# Altium PCB PCB.PcbDoc (part 6 of 8)
Units mm, origin at the board's own origin, x right, y up, seen from the top; angles counter-clockwise.
Board outline 78.8 x 69 mm, 12 copper layers (Top Layer, GND_12, uStrip1, GND_35, Clocks, GND_57, POWER, Slow_Ctrl, GND_810, uStrip2, GND_1012, Bottom Layer), stack 2.926 mm thick; 460 components, 314 nets, 1929 pads, 3409 vias.
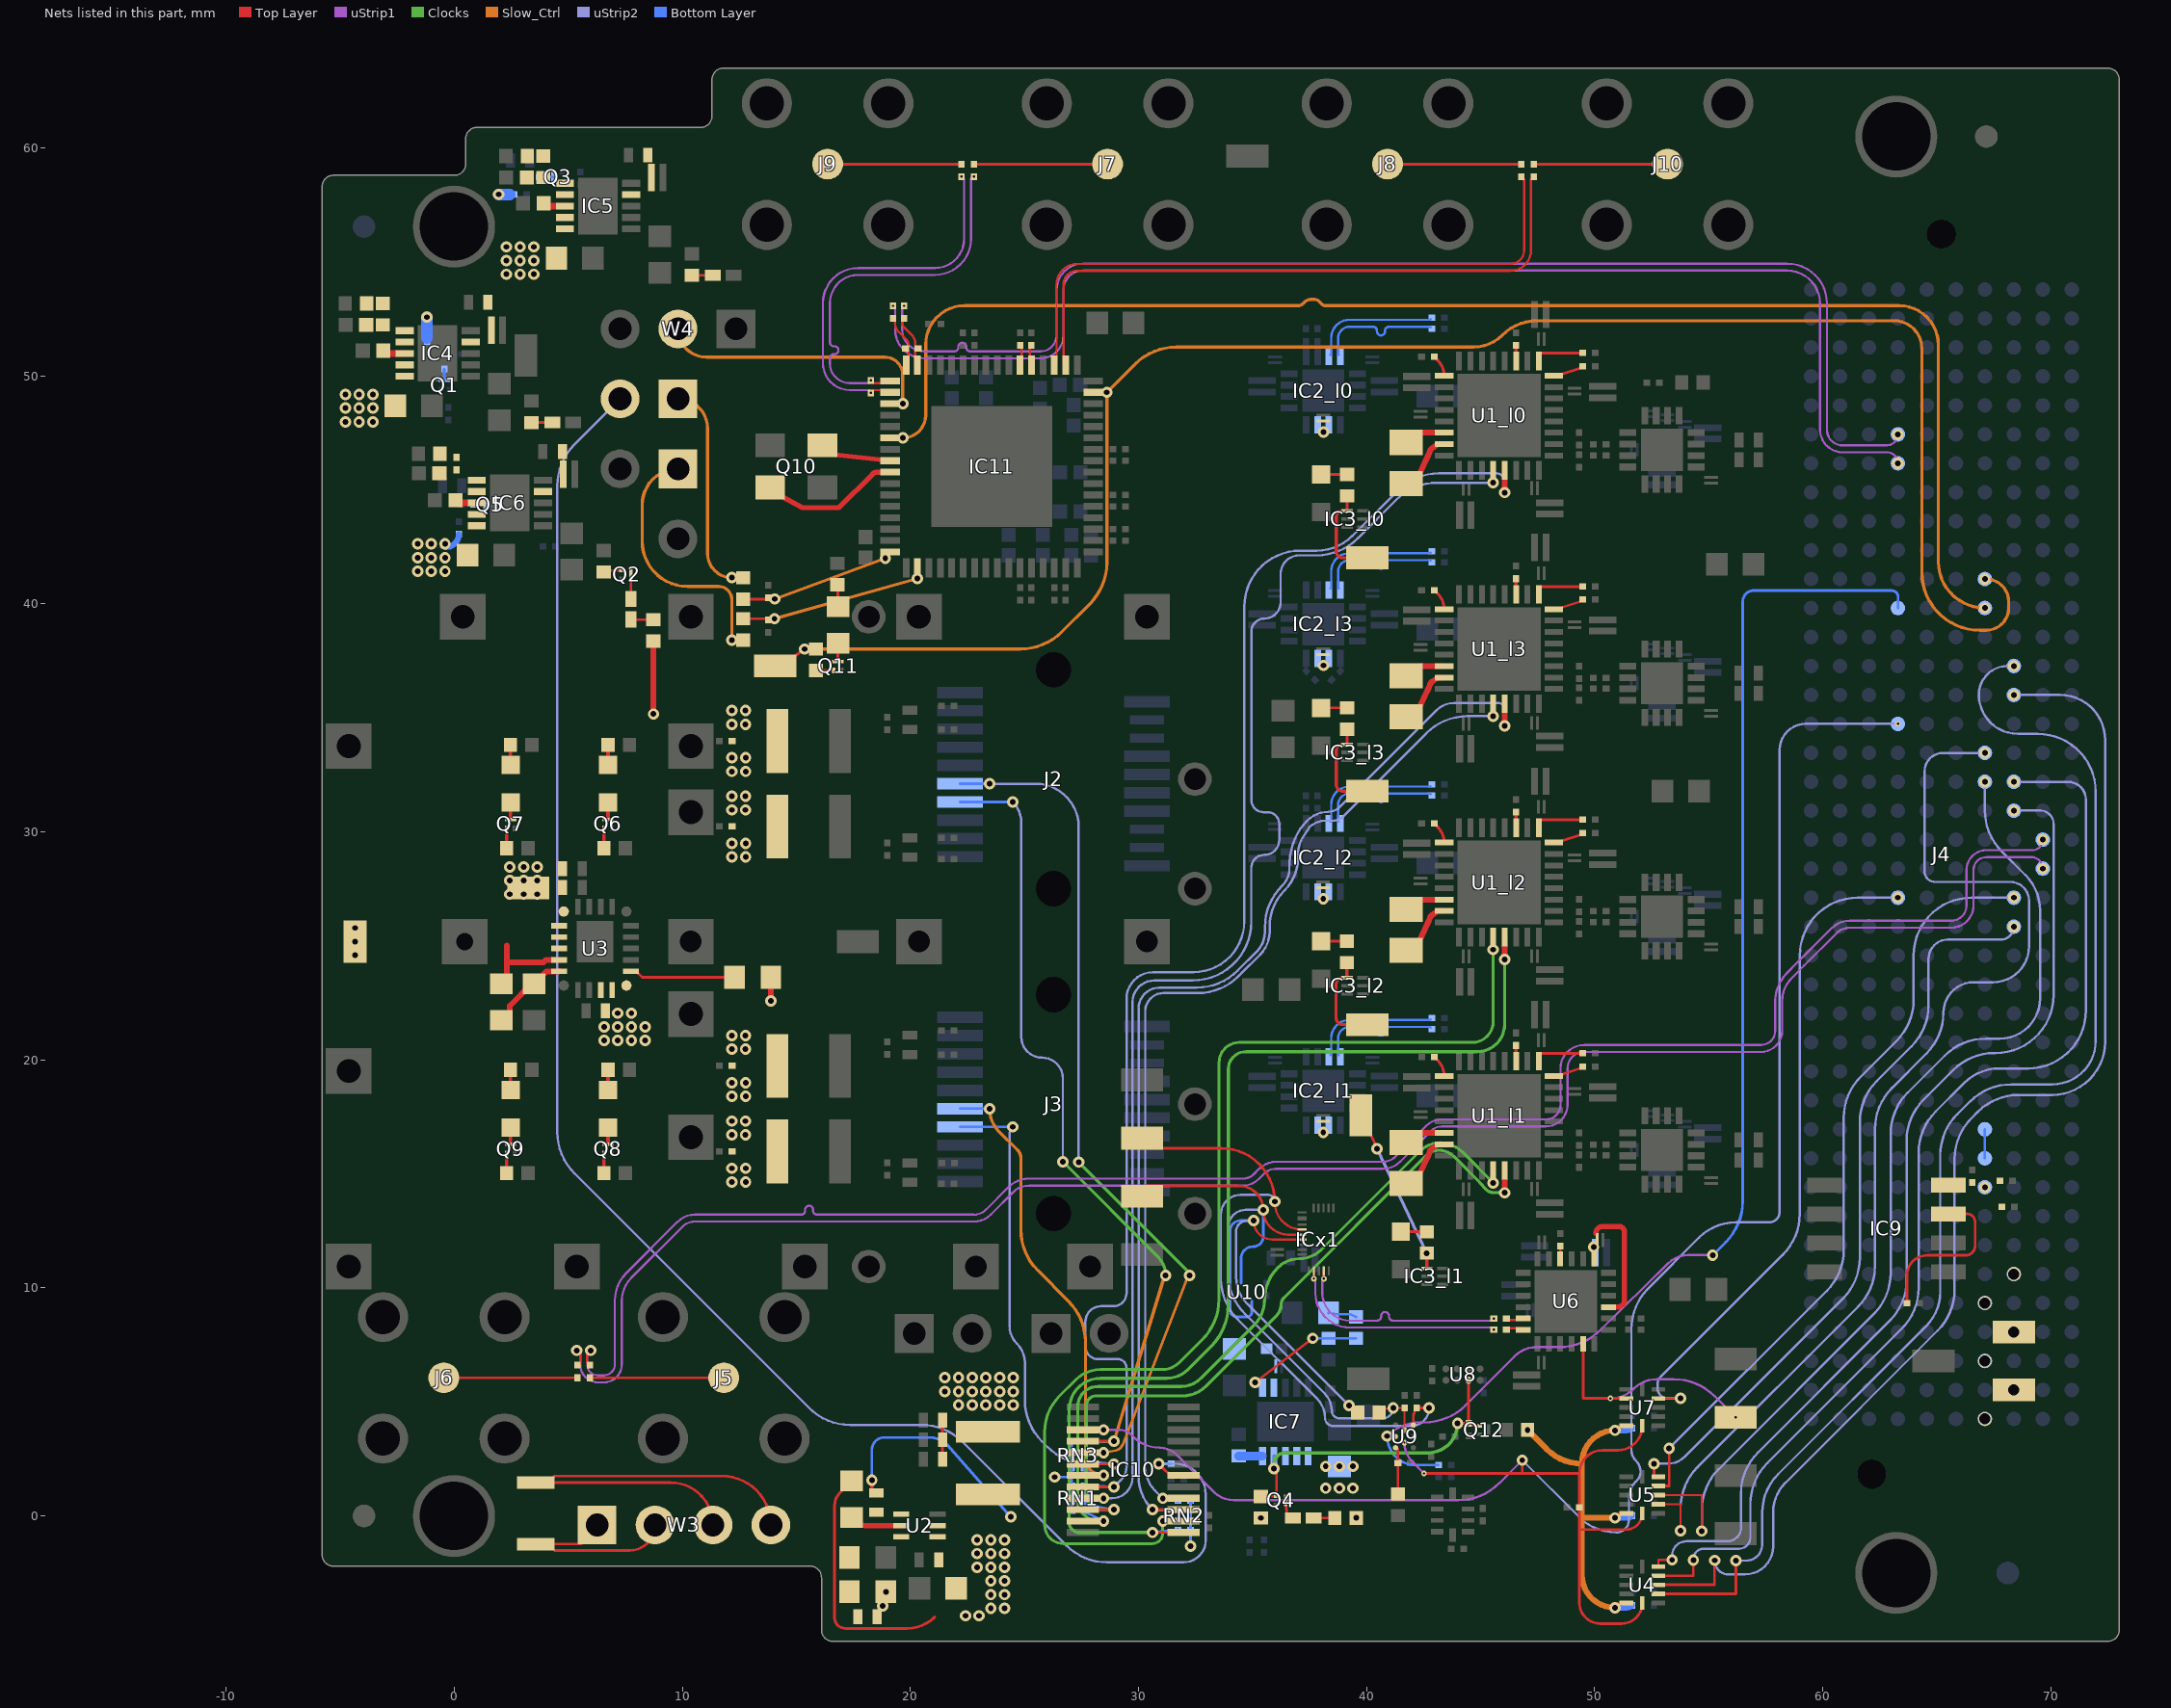
[diagram p15: the nets of this part, all layers, seen from the top]

## Via types
v1: diameter 0.25, hole 0.1, Top Layer to uStrip1, tented both sides, 1130 vias
v2: diameter 0.25, hole 0.1, uStrip2 to Bottom Layer, tented both sides, 686 vias
v3: diameter 0.5, hole 0.25, Top Layer to Bottom Layer, tented both sides, 674 vias
v4: diameter 0.5, hole 0.25, Top Layer to Bottom Layer, 632 vias
v5: diameter 0.5, hole 0.25, uStrip1 to uStrip2, tented both sides, 281 vias
v6: diameter 0.584, hole 0.483, Top Layer to Bottom Layer, tented both sides, 6 vias

## Nets (pads, with @x,y where several pads share a name; then routed paths per layer and width w, separated by ;. In a path a pad name is that pad's centre, name@x,y a point inside that pad or via, vN(x,y) a via of type N, cw(c..) or ccw(c..) an arc to the next point about the centre after c; other vN are vias at no path point) (continued)
GT_REFCLK_AUX_N: C96.1 J4.B21 | length 81.2
  Top Layer w0.099: v3(5.374,7.262) cw(c5.374,7.113) 5.524,7.113 5.524,6.735 cw(c5.401,6.735) C96.1@5.401,6.612
  uStrip1 w0.094: v3(5.374,7.262) cw(c5.374,7.113) 5.524,7.113 5.524,6.8 5.524,6.64 ccw(c6.298,6.64) 6.298,5.865 6.562,5.865 ccw(c6.562,6.646) 7.344,6.646 7.344,9.439 cw(c8.759,9.439) 7.758,10.44 10.002,12.684 cw(c10.555,12.132) 10.555,12.913 10.882,12.913 22.778,12.912 22.78,12.912 ccw(c22.78,13.966) 23.525,13.221 24.51,14.206 cw(c25.198,13.518) 25.198,14.49 34.583,14.49 ccw(c34.581,15.457) 35.265,14.774 35.499,15.008 cw(c36.031,14.476) 36.031,15.228 40.71,15.228 ccw(c40.71,16.324) 41.485,15.549 42.826,16.89 cw(c43.303,16.412) 43.303,17.088 47.864,17.088 ccw(c47.864,18.03) 48.807,18.03 48.807,19.624 cw(c49.537,19.624) 49.537,20.354 57.296,20.354 ccw(c57.296,21.279) 58.222,21.279 58.222,22.579 cw(c59.665,22.579) 58.641,23.596 59.183,24.138 60.608,25.564 cw(c61.19,24.982) 61.19,25.805 65.641,25.805 ccw(c65.641,26.774) 66.61,26.774 66.61,28.333 cw(c67.174,28.333) 67.174,28.898 69.14,28.898 cw(c69.14,28.39) v3(69.648,28.39)
GT_REFCLK_AUX_P: C91.1 J4.B20 | length 81.2
  Top Layer w0.099: C91.1@5.951,6.612 cw(c5.951,6.735) 5.828,6.735 5.828,7.113 cw(c5.978,7.113) v3(5.978,7.262)
  uStrip1 w0.094: v3(5.978,7.262) ccw(c5.978,7.113) 5.828,7.113 5.828,6.926 5.828,6.64 ccw(c6.298,6.64) 6.298,6.17 6.562,6.17 ccw(c6.562,6.646) 7.039,6.646 7.039,9.44 cw(c8.759,9.439) 7.542,10.654 9.787,12.9 cw(c10.555,12.132) 10.555,13.218 10.879,13.218 14.465,13.217 14.512,13.217 15.208,13.217 ccw(c15.208,13.391) 15.382,13.391 15.382,13.434 cw(c15.556,13.434) 15.73,13.434 15.73,13.391 ccw(c15.904,13.391) 15.904,13.217 16.228,13.217 16.275,13.217 22.778,13.217 ccw(c22.778,13.971) 23.311,13.438 24.296,14.422 cw(c25.196,13.522) 25.196,14.795 25.198,14.795 34.581,14.795 ccw(c34.581,15.457) 35.049,14.989 ; 35.049,14.989 35.283,15.223 cw(c36.031,14.476) 36.031,15.533 40.709,15.533 ccw(c40.709,16.328) 41.271,15.766 42.61,17.105 cw(c43.303,16.412) 43.303,17.392 47.864,17.392 ccw(c47.864,18.03) 48.502,18.03 48.502,19.624 cw(c49.537,19.624) 49.537,20.659 57.296,20.659 ccw(c57.296,21.279) 57.917,21.279 57.917,22.579 cw(c59.665,22.579) 58.429,23.815 58.879,24.264 60.393,25.779 cw(c61.19,24.982) 61.19,26.109 65.641,26.109 ccw(c65.641,26.774) 66.305,26.774 66.305,28.333 cw(c67.174,28.333) 67.174,29.202 69.19,29.202 ccw(c69.19,29.66) v3(69.648,29.66)
IN0_N: C107.1 IC11.64 R67.1 | length 2.2
  Top Layer w0.099: C107.1@19.228,52.525 19.228,52.484 19.325,52.386 19.325,52.309 19.325,52.307 ccw(c19.825,52.309) 19.412,52.027 19.439,51.988 19.829,51.598 cw(c19.644,51.412) 19.906,51.412 19.906,51.335 R67.1@19.783,51.212 19.906,51.09 19.906,50.681 IC11.64@19.881,50.656
IN0_P: C105.1 IC11.63 R67.2 | length 2.2
  Top Layer w0.099: C105.1@19.727,52.525 19.727,52.484 19.63,52.386 19.63,52.309 ccw(c19.825,52.309) 19.687,52.171 20.074,51.784 20.099,51.75 cw(c19.644,51.412) 20.211,51.412 20.211,51.335 R67.2@20.333,51.212 20.211,51.09 20.211,50.681 IC11.63@20.236,50.656
IN1_N: C102.1 IC11.2 R65.1 | length 17
  Top Layer w0.099: v1(18.269,49.255) cw(c18.392,49.255) 18.392,49.378 19.011,49.378 cw(c19.011,49.28) IC11.2@19.108,49.28
  uStrip1 w0.094: v1(18.269,49.255) ccw(c18.146,49.255) 18.146,49.378 17.338,49.378 cw(c17.338,50.554) 16.162,50.554 16.162,53.193 cw(c17.705,53.193) 17.705,54.735 21.07,54.735 ccw(c21.07,56.02) 22.355,56.02 22.355,58.617 ccw(c22.232,58.617) v1(22.232,58.739)
IN1_P: C99.1 IC11.1 R65.2 | length 17
  Top Layer w0.099: v1(18.269,49.805) ccw(c18.392,49.805) 18.392,49.683 19.011,49.683 ccw(c19.011,49.78) IC11.1@19.108,49.78
  uStrip1 w0.094: v1(18.269,49.805) cw(c18.146,49.805) 18.146,49.683 17.338,49.683 cw(c17.338,50.554) 16.483,50.386 cw(c17.338,50.554) 16.475,50.433 16.467,50.554 16.467,50.781 cw(c16.641,50.781) 16.641,50.955 16.669,50.955 ccw(c16.669,51.129) 16.669,51.303 16.641,51.303 cw(c16.641,51.477) 16.467,51.477 16.467,52.104 16.467,53.193 cw(c17.705,53.193) 17.705,54.431 21.07,54.431 ccw(c21.07,56.02) 22.66,56.02 22.66,58.617 cw(c22.782,58.617) v1(22.782,58.739)
IN_l0_N: C29_l0.1 IC2_l0.11 | length 5.6
  Bottom Layer w0.099: IC2_l0.11@38.423,50.923 38.447,50.948 38.447,51.5 38.447,51.661 cw(c39.249,51.661) 39.249,52.462 42.71,52.462 42.712,52.464 42.781,52.464 C29_l0.1@42.805,52.487
IN_l0_P: C30_l0.1 IC2_l0.12 | length 5.5
  Bottom Layer w0.099: IC2_l0.12@38.777,50.923 38.752,50.948 38.752,51.374 38.752,51.661 cw(c39.249,51.661) 39.249,52.158 39.875,52.158 40.278,52.158 cw(c40.278,51.981) 40.454,51.981 40.454,51.956 ccw(c40.631,51.956) 40.807,51.956 40.807,51.981 cw(c40.984,51.981) 40.984,52.158 41.44,52.158 42.71,52.158 42.712,52.156 42.781,52.156 C30_l0.1@42.805,52.133
IN_l1_N: C29_l1.1 IC2_l1.11 | length 5.6
  Bottom Layer w0.099: IC2_l1.11@38.423,20.214 38.447,20.239 38.447,20.791 38.447,20.952 cw(c39.249,20.952) 39.249,21.753 42.71,21.753 42.712,21.754 42.781,21.754 C29_l1.1@42.805,21.778
IN_l1_P: C30_l1.1 IC2_l1.12 | length 5.5
  Bottom Layer w0.099: IC2_l1.12@38.777,20.214 38.752,20.239 38.752,20.665 38.752,20.952 cw(c39.249,20.952) 39.249,21.448 39.875,21.448 40.278,21.448 cw(c40.278,21.272) 40.454,21.272 40.454,21.247 ccw(c40.631,21.247) 40.807,21.247 40.807,21.272 cw(c40.984,21.272) 40.984,21.448 41.44,21.448 42.71,21.448 42.712,21.447 42.781,21.447 C30_l1.1@42.805,21.424
IN_l2_N: C29_l2.1 IC2_l2.11 | length 5.6
  Bottom Layer w0.099: IC2_l2.11@38.423,30.451 38.447,30.475 38.447,31.028 38.447,31.188 cw(c39.249,31.188) 39.249,31.99 42.71,31.99 42.712,31.991 42.781,31.991 C29_l2.1@42.805,32.014
IN_l2_P: C30_l2.1 IC2_l2.12 | length 5.5
  Bottom Layer w0.099: IC2_l2.12@38.777,30.451 38.752,30.475 38.752,30.901 38.752,31.188 cw(c39.249,31.188) 39.249,31.685 39.875,31.685 40.278,31.685 cw(c40.278,31.508) 40.454,31.508 40.454,31.483 ccw(c40.631,31.483) 40.807,31.483 40.807,31.508 cw(c40.984,31.508) 40.984,31.685 41.44,31.685 42.71,31.685 42.712,31.684 42.781,31.684 C30_l2.1@42.805,31.66
IN_l3_N: C29_l3.1 IC2_l3.11 | length 5.6
  Bottom Layer w0.099: IC2_l3.11@38.423,40.687 38.447,40.712 38.447,41.264 38.447,41.425 cw(c39.249,41.425) 39.249,42.226 42.71,42.226 42.712,42.227 42.781,42.227 C29_l3.1@42.805,42.251
IN_l3_P: C30_l3.1 IC2_l3.12 | length 5.5
  Bottom Layer w0.099: IC2_l3.12@38.777,40.687 38.752,40.712 38.752,41.138 38.752,41.425 cw(c39.249,41.425) 39.249,41.921 39.875,41.921 40.278,41.921 cw(c40.278,41.745) 40.454,41.745 40.454,41.719 ccw(c40.631,41.719) 40.807,41.719 40.807,41.745 cw(c40.984,41.745) 40.984,41.921 41.44,41.921 42.71,41.921 42.712,41.92 42.781,41.92 C30_l3.1@42.805,41.896
LOL_0_ADJ: J4.C15 U4.3 | length 55.1
  Top Layer w0.117: U4.3@52.789,-3.019 55.258,-3.019 v3(55.258,-1.945)
  uStrip2 w0.102: v3(55.258,-1.945) ccw(c55.876,-1.945) 55.876,-2.563 56.594,-2.563 ccw(c56.594,-1.33) 57.827,-1.33 57.827,0.169 cw(c59.636,0.169) 58.357,1.448 65.036,8.127 ccw(c63.24,9.923) 65.78,9.923 65.78,15.652 cw(c68.32,15.652) 66.524,17.448 66.801,17.724 cw(c68.597,15.928) 68.597,18.468 70.059,18.468 ccw(c70.059,20.789) 72.38,20.789 72.38,34.036 ccw(c70.406,34.036) 70.406,36.01 v3(68.378,36.01)
LOL_1_ADJ: J4.C19 U4.5 | length 44.1
  Top Layer w0.094: U4.5@52.789,-2.219 52.789,-1.924 v3(53.396,-1.924)
  uStrip2 w0.102: v3(53.396,-1.924) 53.396,-1.739 cw(c54.029,-1.739) 54.029,-1.106 55.823,-1.106 ccw(c55.823,-0.515) 56.415,-0.515 56.415,0.988 cw(c58.955,0.988) 57.158,2.784 62.934,8.559 ccw(c61.138,10.355) 63.678,10.355 63.678,16.465 cw(c66.218,16.465) 64.422,18.261 65.721,19.56 cw(c67.517,17.764) 67.517,20.304 67.582,20.304 ccw(c67.582,22.844) 70.122,22.844 70.122,30.349 ccw(c69.529,30.349) 69.529,30.942 68.378,30.942 v3(68.378,30.93)
LOL_2_ADJ: J4.D18 U5.3 | length 44.1
  Top Layer w0.094: U5.3@52.789,0.918 54.697,0.918 v3(54.697,-0.66)
  uStrip2 w0.102: v3(54.697,-0.66) 54.697,0.265 cw(c57.237,0.265) 55.441,2.061 62.234,8.854 ccw(c60.438,10.65) 62.978,10.65 62.978,16.768 cw(c65.518,16.768) 63.722,18.564 65.349,20.192 cw(c67.145,18.395) 67.145,20.935 67.765,20.935 ccw(c67.765,22.699) 69.529,22.699 69.529,26.555 ccw(c67.323,26.555) 68.882,28.115 67.851,29.146 cw(c69.648,30.942) 67.108,30.942 v3(67.108,32.2)
LOL_3_ADJ: J4.C23 U5.5 | length 32.7
  Top Layer w0.117: v3(52.602,2.296) 52.602,1.718 U5.5@52.789,1.718
  uStrip2 w0.102: v3(52.602,2.296) 53.211,2.296 ccw(c53.211,3.342) 53.951,2.602 60.882,9.533 ccw(c59.086,11.329) 61.626,11.329 61.626,17.278 cw(c64.166,17.278) 62.369,19.074 63.893,20.598 ccw(c62.097,22.394) 64.637,22.394 64.637,24.422 cw(c65.497,24.422) 65.497,25.283 67.81,25.283 ccw(c67.81,25.85) v3(68.378,25.85)
LOS_0_ADJ: J4.C14 U4.2 | length 56.9
  Top Layer w0.117: U4.2@52.789,-3.419 56.189,-3.419 v3(56.189,-1.956)
  uStrip2 w0.102: v3(56.189,-1.956) 56.645,-1.956 ccw(c56.645,-1.258) 57.343,-1.258 57.343,0.144 cw(c59.737,0.144) 58.044,1.837 64.536,8.328 ccw(c63.05,9.814) 65.151,9.814 65.151,15.821 cw(c67.691,15.821) 65.895,17.617 66.462,18.184 cw(c68.258,16.388) 68.258,18.928 70.059,18.928 ccw(c70.059,20.837) 71.969,20.837 71.969,31.762 ccw(c69.429,31.762) 69.429,34.302 68.56,34.302 cw(c68.56,36.019) 66.844,36.019 cw(c68.105,36.019) 68.105,37.28 v3(68.378,37.28)
LOS_1_ADJ: J4.C18 U4.4 | length 48.6
  Top Layer w0.117: U4.4@52.789,-2.619 54.327,-2.619 v3(54.327,-1.935)
  uStrip2 w0.102: v3(54.327,-1.935) 54.327,-1.887 cw(c54.78,-1.887) 54.78,-1.433 56.332,-1.433 ccw(c56.332,-0.94) 56.826,-0.94 56.826,0.523 cw(c59.366,0.523) 57.57,2.32 63.463,8.213 ccw(c61.667,10.009) 64.207,10.009 64.207,15.944 cw(c66.747,15.944) 64.951,17.74 66.191,18.981 cw(c67.756,17.416) 67.756,19.629 69.002,19.629 ccw(c69.002,22.168) 71.541,22.168 71.541,31.415 ccw(c70.762,31.415) 70.762,32.195 68.378,32.195 v3(68.378,32.2)
LOS_2_ADJ: J4.D17 U5.2 | length 49.4
  Top Layer w0.094: U5.2@52.789,0.518 53.766,0.518 v3(53.766,-0.65)
  uStrip2 w0.102: v3(53.766,-0.65) 53.766,0.342 cw(c56.306,0.342) 54.51,2.138 ; 54.51,2.138 61.547,9.175 ccw(c59.751,10.971) 62.291,10.971 62.291,16.975 cw(c64.831,16.975) 63.035,18.771 64.547,20.283 ccw(c62.751,22.079) 65.291,22.079 cw(c66.621,22.079) 66.621,23.409 67.467,23.409 ccw(c67.467,24.989) 69.048,24.989 69.048,26.982 ccw(c68.223,26.982) 68.223,27.807 64.925,27.807 cw(c64.925,28.265) 64.467,28.265 64.467,32.662 cw(c65.268,32.662) 65.268,33.464 67.108,33.464 v3(67.108,33.47)
LOS_3_ADJ: J4.C22 U5.4 | length 33.7
  Top Layer w0.117: U5.4@52.789,1.318 53.265,1.318 v3(53.265,2.959)
  uStrip2 w0.102: v3(53.265,2.959) 60.176,9.87 ccw(c58.38,11.666) 60.92,11.666 60.92,17.468 cw(c63.46,17.468) 61.664,19.264 63.239,20.839 ccw(c61.443,22.635) 63.983,22.635 63.983,24.58 cw(c66.523,24.58) 66.523,27.12 v3(68.378,27.12)
NetC28_l0_2: C28_l0.2 U1_l0.3 | length 0.7
  Top Layer w0.137: C28_l0.2@46.549,51.346 46.551,51.344 46.551,50.662 U1_l0.3@46.553,50.66
NetC28_l1_2: C28_l1.2 U1_l1.3 | length 0.7
  Top Layer w0.137: C28_l1.2@46.549,20.637 C28_l1.2@46.551,20.635 46.551,19.953 U1_l1.3@46.553,19.95
NetC28_l2_2: C28_l2.2 U1_l2.3 | length 0.7
  Top Layer w0.137: C28_l2.2@46.549,30.874 46.551,30.871 46.551,30.189 U1_l2.3@46.553,30.187
NetC28_l3_2: C28_l3.2 U1_l3.3 | length 0.7
  Top Layer w0.137: C28_l3.2@46.549,41.11 C28_l3.2@46.551,41.108 46.551,40.425 U1_l3.3@46.553,40.423
NetC31_l0_2: C31_l0.2 IC2_l0.2 IC2_l0.3
  other v3: 38.109,47.538
NetC31_l1_2: C31_l1.2 IC2_l1.2 IC2_l1.3
  other v3: 38.1,16.83
NetC31_l2_2: C31_l2.2 IC2_l2.2 IC2_l2.3
  other v3: 38.1,27.066
NetC31_l3_2: C31_l3.2 IC2_l3.2 IC2_l3.3
  other v3: 38.109,37.302
NetC32_l0_1: C32_l0.1 U1_l0.14 | length 1.8
  Top Layer w0.254: C32_l0.1@41.736,47.085 42.334,47.508 43.124,47.509 U1_l0.14@43.403,47.509
NetC32_l0_2: C32_l0.2 U1_l0.15 | length 2.6
  Top Layer w0.254: C32_l0.2@41.736,45.285 42.334,45.708 42.669,46.44 ccw(c42.461,46.535) 42.672,46.448 42.785,46.723 cw(c42.997,46.636) 42.863,46.822 43.124,47.009 U1_l0.15@43.403,47.009
NetC32_l1_1: C32_l1.1 U1_l1.14 | length 1.8
  Top Layer w0.254: C32_l1.1@41.736,16.376 42.334,16.799 43.124,16.8 U1_l1.14@43.403,16.8
NetC32_l1_2: C32_l1.2 U1_l1.15 | length 2.6
  Top Layer w0.254: C32_l1.2@41.736,14.576 42.334,14.999 42.669,15.731 ccw(c42.461,15.826) 42.672,15.739 42.785,16.014 cw(c42.997,15.927) 42.863,16.113 43.124,16.3 U1_l1.15@43.403,16.3
NetC32_l2_1: C32_l2.1 U1_l2.14 | length 1.8
  Top Layer w0.254: C32_l2.1@41.736,26.612 42.334,27.035 43.124,27.036 U1_l2.14@43.403,27.036
NetC32_l2_2: C32_l2.2 U1_l2.15 | length 2.6
  Top Layer w0.254: C32_l2.2@41.736,24.812 42.334,25.235 42.669,25.967 ccw(c42.461,26.062) 42.672,25.975 42.785,26.25 cw(c42.997,26.163) 42.863,26.349 43.124,26.536 U1_l2.15@43.403,26.536
NetC32_l3_1: C32_l3.1 U1_l3.14 | length 1.8
  Top Layer w0.254: C32_l3.1@41.736,36.848 42.334,37.271 43.124,37.273 U1_l3.14@43.403,37.273
NetC32_l3_2: C32_l3.2 U1_l3.15 | length 2.6
  Top Layer w0.254: C32_l3.2@41.736,35.048 42.334,35.471 42.669,36.203 ccw(c42.461,36.298) 42.672,36.212 42.785,36.487 cw(c42.997,36.4) 42.863,36.585 43.124,36.773 U1_l3.15@43.403,36.773
NetC36_2: C36.2 IC4.7 R11.2
NetC37_2: C37.2 C38.2 IC4.4
NetC39_2: C39.2 IC4.8 | length 1
  Top Layer w0.305: C39.2@-3.116,51.111 -2.958,50.987 IC4.8@-2.182,50.987
NetC41_1: C41.1 L1.1 U2.2 | length 9.9
  Top Layer w0.152: v3(18.309,1.576) 18.309,1.139 C41.1@18.507,1.015
  Bottom Layer w0.117: v3(18.309,1.576) 18.309,2.898 cw(c18.853,2.898) 18.853,3.442 20.846,3.442 cw(c20.846,2.379) 21.595,3.134 21.598,3.131 v3(24.394,-0.034)
NetC41_2: C41.2 U2.4
NetC48_1: C48.1 R15.2 R16.2 U2.6
NetC49_2: C49.2 IC5.7 R17.2
NetC50_2: C50.2 C51.2 IC5.4
NetC52_2: C52.2 IC5.8 | length 1
  Top Layer w0.305: C52.2@3.917,57.573 4.074,57.449 IC5.8@4.851,57.449
NetC58_2: C58.2 IC6.7 R23.2
NetC59_2: C59.2 C60.2 IC6.4
NetC61_2: C61.2 IC6.8 | length 1
  Top Layer w0.305: C61.2@0.05,44.555 ccw(c0.35,44.855) 0.35,44.43 IC6.8@0.984,44.43
NetC66_2: C66.2 C67.2 IC7.7 R35.2
NetC91_2: C91.2 J5.1 | length 5.9
  Top Layer w0.117: C91.2@5.951,6.062 J5.1@11.814,6.062
NetC96_2: C96.2 J6.1 | length 5.9
  Top Layer w0.117: J6.1@-0.461,6.062 C96.2@5.401,6.062
NetC143_2: C143.2 C144.2 U6.3 U6.7 | length 5.4
  Top Layer w0.229: 50.054,12.399 cw(c50.352,12.399) 50.352,12.697 51.055,12.697 cw(c51.055,12.441) 51.311,12.441 51.311,9.468 cw(c51.009,9.468) 51.009,9.165 U6.3@50.609,9.165
  other v3: 49.954,11.799
NetC150_2: C150.2 R80.1 U9.7 | length 2.1
  Top Layer w0.117: U9.7@41.271,2.99 cw(c41.271,2.886) 41.375,2.886 C150.2@41.375,2.312 R80.1@41.375,0.964
NetD1_2: D1.2 R9.1 | length 0.9
  Top Layer w0.117: R9.1@3.382,47.956 D1.2@4.303,47.956
NetD2_2: D2.2 R14.1 | length 0.9
  Top Layer w0.117: R14.1@10.415,54.418 D2.2@11.335,54.418
NetD3_1: D3.1 Q2.3 | length 1.1
  Top Layer w0.117: D3.1@7.744,40.22 Q2.3@7.744,41.294
NetD3_2: D3.2 R21.1 | length 1
  Top Layer w0.117: D3.2@7.744,39.32 7.936,39.312 8.473,39.312 R21.1@8.724,39.309
NetD4_1: D4.1 Q4.3 | length 0.9
  Top Layer w0.117: Q4.3@36.451,0.686 36.505,0.086 D4.1@36.779,-0.087
NetD4_2: D4.2 R31.1 | length 0.9
  Top Layer w0.117: D4.2@37.679,-0.087 37.952,-0.084 38.394,-0.084 R31.1@38.608,-0.082
NetD5_1: D5.1 Q11.3 | length 0.8
  Top Layer w0.117: Q11.3@16.821,37.481 D5.1@16.821,38.234
NetD5_2: D5.2 R72.1 | length 1
  Top Layer w0.117: D5.2@16.821,39.878 R72.1@16.821,40.819
  Top Layer w0.152: R72.1@16.799,40.842 R72.1@16.821,40.819
NetIC3_l0_4: IC3_l0.4 R6_l0.2 TP1_l0.1 | length 4.3
  Top Layer w0.137: IC3_l0.4@39.14,44.076 IC3_l0.4@39.143,44.076 ; R6_l0.2@39.143,44.74 IC3_l0.4@39.143,44.076 ; TP1_l0.1@40.031,42.023 38.958,42.023 cw(c38.958,42.312) 38.669,42.312 38.669,43.801 cw(c38.944,43.801) 38.944,44.076 IC3_l0.4@39.143,44.076
NetIC3_l1_4: IC3_l1.4 R6_l1.2 TP1_l1.1 | length 7.4
  Top Layer w0.117: TP1_l1.1@39.744,17.575 40.185,16.709 v4(40.458,16.11)
  Top Layer w0.137: IC3_l1.4@42.637,10.862 IC3_l1.4@42.64,10.862 v4(42.64,11.526)
  uStrip2 w0.137: v4(40.458,16.11) v4(42.64,11.526)
NetIC3_l2_4: IC3_l2.4 R6_l2.2 TP1_l2.1 | length 4.3
  Top Layer w0.137: R6_l2.2@39.14,24.267 IC3_l2.4@39.14,23.603 38.94,23.603 ccw(c38.94,23.328) 38.665,23.328 38.665,21.839 ccw(c38.954,21.839) 38.954,21.55 TP1_l2.1@40.028,21.55
NetIC3_l3_4: IC3_l3.4 R6_l3.2 TP1_l3.1 | length 4.3
  Top Layer w0.137: IC3_l3.4@39.14,33.84 IC3_l3.4@39.143,33.84 ; R6_l3.2@39.143,34.503 IC3_l3.4@39.143,33.84 ; TP1_l3.1@40.031,31.786 38.958,31.786 cw(c38.958,32.075) 38.669,32.075 38.669,33.565 cw(c38.944,33.565) 38.944,33.84 IC3_l3.4@39.143,33.84
NetIC4_6: IC4.6 R11.1 R12.2
NetIC5_6: IC5.6 R17.1 R18.2
NetIC6_6: IC6.6 R23.1 R26.2
NetIC7_5: IC7.5 R30.2 | length 1
  Bottom Layer w0.381: R30.2@34.392,2.634 IC7.5@35.438,2.634
NetIC7_6: IC7.6 R34.1 R38.2 | length 5.1
  Top Layer w0.117: v3(35.109,5.857) v3(37.638,7.791)
  Bottom Layer w0.117: v3(37.638,7.791) R34.1@38.331,7.791 R38.2@39.534,7.791
NetIC8_1: IC8.1 W3.1 W3.2 | length 9.1
  Top Layer w0.117: W3.1@6.26,-0.392 cw(c5.421,-0.392) 5.421,-1.23 IC8.1@3.566,-1.23 4.333,-1.447 4.396,-1.511 7.681,-1.511 ccw(c7.681,-0.392) W3.2@8.8,-0.392
NetIC8_2: IC8.2 W3.3 W3.4 | length 20.4
  Top Layer w0.117: W3.3@11.34,-0.392 ccw(c9.478,-0.392) 9.478,1.47 IC8.2@3.566,1.47 4.333,1.686 4.396,1.75 11.738,1.75 cw(c11.738,-0.392) W3.4@13.88,-0.392
NetIC9_7: IC9.7 R59.2 | length 7.4
  Top Layer w0.117: R59.2@63.695,9.332 63.695,10.552 cw(c64.575,10.552) 64.575,11.431 66.265,11.431 ccw(c66.265,11.845) 66.679,11.845 66.679,12.9 ccw(c66.331,12.9) 66.331,13.248 IC9.7@65.503,13.248 ; R59.2@63.778,9.333 R59.2@63.781,9.333
NetIC11_3: IC11.3 W4.2 | length 12.3
  Slow_Ctrl w0.137: W4.2@9.808,52.063 ccw(c11.046,52.063) 11.046,50.825 18.876,50.825 cw(c18.876,50.039) 19.663,50.039 19.663,48.78 v3(19.667,48.78)
NetIC11_8: IC11.8 Q10.1 | length 3.1
  Top Layer w0.229: Q10.1@16.146,46.955 16.682,46.545 18.798,46.316 IC11.8@19.108,46.28
NetIC11_9: IC11.9 Q10.3 | length 6.1
  Top Layer w0.229: Q10.3@13.846,45.105 14.369,44.707 15.267,44.224 16.86,44.224 18.356,45.707 cw(c18.528,45.52) 18.528,45.774 18.81,45.774 IC11.9@19.108,45.78
NetIC11_16: IC11.16 R68.1 R70.2 | length 6.3
  Top Layer w0.117: R70.2@12.665,40.213 13.713,40.213 R68.1@13.768,40.268
  Slow_Ctrl w0.137: v3@14.04,40.213 v3(18.899,42.005)
  other v3: 14.052,40.218
NetIC11_18: IC11.18 R69.1 R71.2 | length 7.6
  Top Layer w0.117: R71.2@12.665,39.353 13.712,39.353 R69.1@13.767,39.298
  Slow_Ctrl w0.137: v3(14.04,39.353) v3(20.308,41.122)
NetJ4_D30: J4.D30 J4.D31 | length 1.3
  Bottom Layer w0.117: J4.D31@67.108,15.69 J4.D30@67.108,16.96
NetLED1_l0_2: LED1_l0.2 R6_l0.1 | length 1.1
  Top Layer w0.117: LED1_l0.2@38.003,45.68 R6_l0.1@39.143,45.68
NetLED1_l1_2: LED1_l1.2 R6_l1.1 | length 1.1
  Top Layer w0.117: LED1_l1.2@41.5,12.466 R6_l1.1@42.64,12.466
NetLED1_l2_2: LED1_l2.2 R6_l2.1 | length 1.1
  Top Layer w0.117: LED1_l2.2@38,25.206 R6_l2.1@39.14,25.207
NetLED1_l3_2: LED1_l3.2 R6_l3.1 | length 1.1
  Top Layer w0.117: LED1_l3.2@38.003,35.443 R6_l3.1@39.143,35.443
NetLED2_1: LED2.1 Q6.3 | length 0.7
  Top Layer w0.152: Q6.3@6.74,30.547 LED2.1@6.74,31.29
NetLED2_2: LED2.2 R41.1 | length 0.9
  Top Layer w0.152: LED2.2@6.74,32.941 R41.1@6.74,33.819
NetLED3_1: LED3.1 Q7.3 | length 0.7
  Top Layer w0.152: 2.467,30.639 LED3.1@2.467,31.29
NetLED3_2: LED3.2 R42.1 | length 0.9
  Top Layer w0.152: LED3.2@2.467,32.941 R42.1@2.467,33.819
NetLED4_1: LED4.1 Q8.3 | length 0.7
  Top Layer w0.152: Q8.3@6.74,16.297 LED4.1@6.74,17.039
NetLED4_2: LED4.2 R49.1 | length 0.9
  Top Layer w0.152: LED4.2@6.74,18.69 R49.1@6.74,19.569
NetLED5_1: LED5.1 Q9.3 | length 0.7
  Top Layer w0.152: Q9.3@2.467,16.297 LED5.1@2.467,17.039
NetLED5_2: LED5.2 R50.1 | length 0.9
  Top Layer w0.152: LED5.2@2.467,18.69 R50.1@2.467,19.569
NetQ1_3: Q1.3 R8.1 | length 0.5
  Bottom Layer w0.117: Q1.3@-0.438,49.804 R8.1@-0.438,50.301
NetQ2_1: Q2.1 R24.2 | length 0.8
  Top Layer w0.117: R24.2@6.648,41.336 6.648,41.469 Q2.1@7.344,41.469
NetQ3_3: Q3.3 R29.1 | length 0.5
  Bottom Layer w0.117: R29.1@3.834,58.723 Q3.3@4.331,58.723
NetQ5_3: Q5.3 R37.1 | length 0.5
  Bottom Layer w0.117: R37.1@0.857,44.364 Q5.3@1.354,44.364
NetQ6_1: Q6.1 R46.2 | length 0.9
  Top Layer w0.152: R46.2@6.565,29.287 Q6.1@6.565,30.147
NetQ7_1: Q7.1 R47.2 | length 0.9
  Top Layer w0.152: R47.2@2.292,29.287 Q7.1@2.292,30.147
NetQ8_1: Q8.1 R54.2 | length 0.9
  Top Layer w0.152: R54.2@6.565,15.037 Q8.1@6.565,15.897
NetQ9_1: Q9.1 R55.2 | length 0.9
  Top Layer w0.152: R55.2@2.292,15.037 Q9.1@2.292,15.897
NetQ11_1: Q11.1 R73.2 | length 0.8
  Top Layer w0.117: R73.2@15.86,37.081 Q11.1@16.646,37.081
NetR3_l0_1: R3_l0.1 U1_l0.32 | length 1.4
  Top Layer w0.127: U1_l0.32@48.204,50.009 48.547,50.073 49.394,50.35 R3_l0.1@49.481,50.424
NetR3_l1_1: R3_l1.1 U1_l1.32 | length 1.4
  Top Layer w0.127: U1_l1.32@48.204,19.3 48.547,19.364 49.394,19.641 R3_l1.1@49.481,19.715
NetR3_l2_1: R3_l2.1 U1_l2.32 | length 1.4
  Top Layer w0.127: U1_l2.32@48.204,29.536 48.547,29.6 49.394,29.877 R3_l2.1@49.481,29.951
NetR3_l3_1: R3_l3.1 U1_l3.32 | length 1.4
  Top Layer w0.127: U1_l3.32@48.204,39.773 48.547,39.836 49.394,40.114 R3_l3.1@49.481,40.188
NetR4_l0_1: R4_l0.1 U1_l0.1 | length 2.2
  Top Layer w0.127: U1_l0.1@47.553,50.66 47.617,50.997 49.394,50.997 R4_l0.1@49.481,51.013
NetR4_l1_1: R4_l1.1 U1_l1.1 | length 2.2
  Top Layer w0.127: U1_l1.1@47.553,19.95 47.617,20.288 49.394,20.288 R4_l1.1@49.481,20.304
NetR4_l2_1: R4_l2.1 U1_l2.1 | length 2.2
  Top Layer w0.127: U1_l2.1@47.553,30.187 47.617,30.524 49.394,30.524 R4_l2.1@49.481,30.54
NetR4_l3_1: R4_l3.1 U1_l3.1 | length 2.2
  Top Layer w0.127: U1_l3.1@47.553,40.423 47.617,40.761 49.394,40.761 R4_l3.1@49.481,40.776
NetR5_l0_2: R5_l0.2 U1_l0.9 | length 1
  Top Layer w0.127: R5_l0.2@42.962,50.841 43.127,50.677 cw(c42.459,50.009) U1_l0.9@43.403,50.009
NetR5_l1_2: R5_l1.2 U1_l1.9 | length 1
  Top Layer w0.127: R5_l1.2@42.974,20.12 43.127,19.967 cw(c42.459,19.3) U1_l1.9@43.403,19.3
NetR5_l2_2: R5_l2.2 U1_l2.9 | length 1
  Top Layer w0.127: R5_l2.2@42.962,30.369 43.127,30.204 cw(c42.459,29.536) U1_l2.9@43.403,29.536
NetR5_l3_2: R5_l3.2 U1_l3.9 | length 1
  Top Layer w0.127: R5_l3.2@42.962,40.605 43.127,40.44 cw(c42.459,39.773) U1_l3.9@43.403,39.773
NetR13_1: R13.1 U2.5 | length 2.3
  Top Layer w0.229: R13.1@17.421,-0.064 17.615,-0.259 ccw(c18.004,0.13) 18.004,-0.419 U2.5@19.594,-0.419
NetR19_1: R19.1 U3.2 | length 4.6
  Top Layer w0.117: U3.2@7.747,23.89 7.972,23.89 8.24,23.622 R19.1@12.281,23.622
NetR20_1: R20.1 R22.2 U3.17 | length 3.6
  Top Layer w0.254: R20.1@2.056,21.742 2.106,21.742 2.429,22.065 2.429,22.373 3.397,23.342 3.447,23.342 R22.2@3.497,23.342 4.044,23.888 4.595,23.888 U3.17@4.597,23.89
NetR38_1: R38.1 R39.2 | length 1.2
  Bottom Layer w0.117: R39.2@38.331,8.907 38.723,8.85 39.283,8.85 R38.1@39.534,8.731
NetR70_1: R70.1 W5.1 | length 9.2
  Slow_Ctrl w0.137: W5.1@9.808,48.994 cw(c9.808,47.697) 11.105,47.697 11.105,42.215 ccw(c12.167,42.215) v3(12.167,41.153)
NetR71_1: R71.1 W6.1 | length 11.2
  Slow_Ctrl w0.137: W6.1@9.808,45.925 ccw(c9.808,44.355) 8.238,44.355 8.238,42.753 ccw(c10.222,42.753) 10.222,40.769 11.589,40.769 cw(c11.587,40.188) 12.167,40.188 v3(12.167,38.413)
NetR76_2: R76.2 U6.10 | length 0.5
  Top Layer w0.102: U6.10@48.492,11.282 R76.2@48.492,11.831
OE_LS: IC10.3 J4.G16 R64.2 U4.12 U5.12 U7.12 U9.8 | length 95.7
  Top Layer w0.117: v1(42.517,1.867) 46.826,1.867 ; v4(46.826,2.448) 46.826,1.867 ; U4.12@52.089,-3.819 cw(c51.188,-3.819) 51.188,-4.719 50.244,-4.719 cw(c50.244,-3.805) 49.33,-3.805 49.33,-0.592 ; U5.12@52.089,0.118 cw(c51.379,0.118) 51.379,-0.592 49.33,-0.592 ; U7.12@52.089,3.957 cw(c51.016,3.957) 51.016,2.885 50.348,2.885 ccw(c50.348,1.867) 49.406,2.253 ccw(c50.348,1.867) 49.33,1.867 ; 46.826,1.867 49.33,1.867 ; 49.33,-0.592 49.33,1.867
  uStrip1 w0.102: v3(28.467,3.777) 29.18,3.777 cw(c29.18,3.072) 29.679,3.571 29.777,3.473 ccw(c30.937,4.633) 30.937,2.992 cw(c30.937,1.949) 31.675,2.687 33.314,1.048 ccw(c34.171,1.905) 34.171,0.693 44.019,0.693 ccw(c44.019,3.233) 45.815,1.437 v4(46.826,2.448) ; v1(41.661,3.22) ccw(c42.862,3.22) 42.013,2.371 v1(42.517,1.867)
  uStrip2 w0.102: v4(46.826,2.448) 49.322,-0.048 ccw(c50.949,1.579) 50.949,-0.721 ccw(c50.949,-0.164) 51.506,-0.164 51.506,0.792 cw(c52.514,0.792) 51.801,1.505 51.853,1.557 ccw(c51.473,1.937) 52.01,1.937 ccw(c51.325,1.937) 51.81,2.421 cw(c52.294,2.905) 51.609,2.905 51.609,8.189 cw(c54.149,8.189) 52.353,9.985 54.579,12.211 cw(c56.194,10.597) 56.194,12.88 57.645,12.88 ccw(c57.645,13.348) 58.113,13.348 58.113,33.606 cw(c59.248,33.606) 59.248,34.74 v2(63.298,34.74)
OE_SN74: C148.1 IC7.4 Q4.1 Q12.1 R33.1 U8.7 | length 14.7
  Top Layer w0.117: R33.1@35.367,0.852 35.367,0.861 Q4.1@36.051,0.861 36.051,1.959 ccw(c35.938,1.959) v3(35.938,2.073) ; v3@43.992,4.062 C148.1@44.473,4.062 ; U8.7@44.475,5.953 44.475,4.154 C148.1@44.473,4.062 ; Q12.1@44.943,3.946 44.877,3.963 44.551,3.971 C148.1@44.473,4.062
  Clocks w0.152: v3(35.938,2.073) 35.938,2.273 cw(c36.436,2.273) 36.436,2.772 42.7,2.772 ccw(c42.7,4.063) v3(43.991,4.063)
  Bottom Layer w0.152: v3(35.938,2.073) IC7.4@35.938,2.634
P2V05: C53.2 C54.2 C56.2 IC6.9 IC6.10 R20.2 R36.2 TP5.1 U3.12 U3.13 U3.14 U3.15 U3.16 | length 5.2
  Top Layer w0.254: R20.2@2.056,23.342 2.295,23.581 2.295,24.274 ; 2.295,25.017 2.295,24.274 ; U3.16@4.597,24.39 4.595,24.388 4.013,24.388 3.899,24.274 2.295,24.274
  Bottom Layer w0.117: v4@-0.565,42.494 v4@-0.363,42.494
  Bottom Layer w0.254: v4@-0.363,42.494 ccw(c-0.363,43.054) R36.2@0.197,43.054
  other v4: 2.438,27.269 3.038,27.269 3.638,27.269 2.438,27.869 3.038,27.869 3.638,27.869 2.438,28.469 3.038,28.469 3.638,28.469 -1.609,41.432 -1.009,41.432 -0.409,41.432 -1.609,42.032 -1.009,42.032 -0.409,42.032 -1.609,42.632 -1.009,42.632 -0.409,42.632
P3V3: C55.2 C62.2 C71.2 C74.2 C77.2 C80.2 C93.2 C95.2 C147.2 IC7.1 IC7.2 IC7.3 J4.C39 J4.D36 J4.D38 J4.D40 L2.2 L3.2 L4.2 L5.2 R19.2 R21.2 R31.2 R33.2 R77.2 RN1.5 RN1.6 RN1.7 RN1.8 RN2.5 RN2.6 RN2.7 RN2.8 RN3.1 RN3.2 RN3.3 RN3.4 TP9.1 U3.1 U3.21 U3.22 U4.11 U5.11 U7.11 | length 27.4
  Top Layer w0.178: v3(50.897,-4.02) cw(c51.266,-4.25) U4.11@51.178,-3.824 ; v3(50.897,-0.084) cw(c51.266,-0.314) 51.178,0.112 U5.11@51.389,0.118 ; v3(50.897,3.756) cw(c51.266,3.526) U7.11@51.178,3.952
  Top Layer w0.254: R21.2@8.724,38.369 8.734,38.359 v3(8.734,35.172) ; v4(13.881,22.591) R19.2@13.881,23.622
  Slow_Ctrl w0.254: v3(47.057,3.772) 47.897,2.931 ccw(c49.436,4.47) 49.436,2.294 ; 49.436,-2.573 ccw(c50.883,-2.573) v3(50.897,-4.02) ; 49.436,-2.572 49.436,-0.084 ; v3(50.897,-0.084) 49.436,-0.084 ; v3(50.897,3.756) ccw(c50.897,2.294) 49.436,2.294 ; 49.436,-0.084 49.436,2.294
  Bottom Layer w0.117: v3(26.33,1.709) 27.07,1.713 ; RN3.4@27.068,3.249 RN3.3@27.068,2.849 RN3.2@27.068,2.449 RN3.1@27.068,2.049 27.07,1.713 ; RN1.5@27.072,0.177 RN1.6@27.072,0.577 RN1.7@27.072,0.977 RN1.8@27.072,1.377 27.07,1.713 ; v3@32.28,-1.324 RN2.8@32.28,-0.573 RN2.7@32.28,-0.173 RN2.6@32.28,0.227 RN2.5@32.28,0.627 ccw(c32.318,0.627) RN2.5@32.318,0.59
  Bottom Layer w0.254: v3(32.277,-1.324) v3@32.28,-1.324 ; v3(50.897,-4.02) 51.388,-4.02 ccw(c51.388,-3.673) C93.2@51.633,-3.919 ; v3(50.897,-0.084) 51.388,-0.084 ccw(c51.388,0.263) C95.2@51.633,0.018 ; v3(50.897,3.756) 51.388,3.756 ccw(c51.388,4.102) C147.2@51.633,3.857
  other v3: 35.367,-0.088 39.548,-0.082
  other v4: 38.206,1.22 38.806,1.22 39.406,1.22 38.206,2.175 38.806,2.175 39.406,2.175 12.174,14.65 12.774,14.65 12.174,15.25 12.774,15.25 12.169,16.718 12.769,16.718 12.169,17.318 12.769,17.318 12.174,18.404 12.774,18.404 12.174,19.004 12.774,19.004 12.169,20.472 12.769,20.472 6.566,20.851 7.166,20.851 7.766,20.851 8.366,20.851 12.169,21.072 12.769,21.072 6.566,21.451 7.166,21.451 7.766,21.451 8.366,21.451 7.166,22.051 7.766,22.051 12.174,28.9 12.774,28.9 12.174,29.5 12.774,29.5 12.169,30.968 12.769,30.968 12.169,31.568 12.769,31.568 12.174,32.654 12.774,32.654 12.174,33.254 12.774,33.254 12.169,34.722 12.769,34.722 12.169,35.322 12.769,35.322
  other v6: 67.108,4.26 68.378,5.53 67.108,6.8 67.108,9.34
P3V3A: C89.2 IC9.8 J4.D32 R57.2 R58.2
  other v3: 67.108,14.42
P3V6: C34.2 C42.1 C44.2 C45.2 C46.2 C48.2 IC4.9 IC4.10 IC5.9 IC5.10 L1.2 R7.2 R15.1 R28.2 TP3.1 | length 3.1
  Top Layer w0.127: C42.1@21.41,2.489 C44.2@21.41,3.343 C45.2@21.41,4.197
  Bottom Layer w0.508: -1.198,51.661 v3(-1.198,52.578) ; v3(1.945,57.963) 2.429,57.963
  other v4: 18.788,-3.941 18.922,-3.326 22.108,4.865 22.708,4.865 23.308,4.865 23.908,4.865 24.508,4.865 21.508,5.465 22.108,5.465 22.708,5.465 23.308,5.465 23.908,5.465 24.508,5.465 21.508,6.065 22.108,6.065 22.708,6.065 23.308,6.065 23.908,6.065 24.508,6.065 -4.349,24.59 -4.349,25.19 -4.349,25.79 -4.774,47.989 -4.174,47.989 -3.574,47.989 -4.774,48.589 -4.174,48.589 -3.574,48.589 -4.774,49.189 -4.174,49.189 -3.574,49.189 2.285,54.46 2.885,54.46 3.485,54.46 2.285,55.06 2.885,55.06 3.485,55.06 2.285,55.66 2.885,55.66 3.485,55.66
P12V: C40.1 C43.2 J4.C35 J4.C37 R13.2 TP8.1 U2.1 | length 11.1
  Top Layer w0.127: 16.671,-2.463 16.671,-4.485 ccw(c17.139,-4.46) 17.139,-4.929 19.861,-4.929 ccw(c19.861,-3.239) 21.056,-4.434 ; 16.671,-2.463 16.671,0.459 cw(c17.459,0.459) 16.902,1.016 R13.2@17.421,1.536
  other v4: 22.411,-4.376 23.011,-4.376 23.524,-4.049 24.124,-4.049 23.524,-3.449 24.124,-3.449 23.524,-2.849 24.124,-2.849 22.924,-2.249 23.524,-2.249 24.124,-2.249 22.924,-1.649 23.524,-1.649 24.124,-1.649 22.924,-1.049 23.524,-1.049 24.124,-1.049
  other v6: 68.378,8.07 68.378,10.61
PLL_IN_AUX_N: C102.2 J9.1 | length 5.9
  Top Layer w0.117: J9.1@16.37,59.289 C102.2@22.232,59.289
PLL_IN_AUX_P: C99.2 J7.1 | length 5.9
  Top Layer w0.117: C99.2@22.782,59.289 J7.1@28.645,59.289
PLL_Lock: IC11.47 J4.D11 R73.1 TP11.1 | length 79.1
  Top Layer w0.137: TP11.1@14.073,37.285 14.929,37.716 v3(15.362,38.021)
  Slow_Ctrl w0.137: v3(15.362,38.021) 24.824,38.021 ccw(c24.824,40.561) 26.62,38.765 27.869,40.014 ccw(c26.073,41.81) 28.613,41.81 v3(28.613,49.28) 29.857,50.524 cw(c31.652,48.729) 31.652,51.268 36.654,51.268 44.701,51.268 ccw(c44.701,53.017) 45.938,51.78 cw(c47.486,50.233) 47.486,52.422 63.131,52.422 cw(c63.131,51.208) 64.344,51.208 64.344,41.386 ccw(c66.884,41.386) 66.884,38.846 67.177,38.846 ccw(c67.177,39.823) 68.153,39.823 68.153,40.102 ccw(c67.165,40.102) 67.165,41.09 v3(67.108,41.09)
PLL_OUT_N: C98.1 IC11.53 | length 1
  Top Layer w0.099: IC11.53@25.308,50.48 cw(c25.308,50.553) 25.236,50.553 25.236,51.276 cw(c25.308,51.276) C98.1@25.308,51.348
PLL_OUT_P: C97.1 IC11.54 | length 1
  Top Layer w0.099: IC11.54@24.808,50.48 ccw(c24.808,50.553) 24.881,50.553 24.881,51.276 ccw(c24.809,51.276) C97.1@24.809,51.348
PLL_OUTA_N: C104.1 IC11.50 | length 28.2
  Top Layer w0.099: IC11.50@26.808,50.48 26.711,50.578 26.711,54.009 cw(c27.308,54.009) 27.308,54.606 46.308,54.606 ccw(c46.308,55.508) 47.21,55.508 47.21,58.617 C104.1@47.332,58.739
PLL_OUTA_P: C101.1 IC11.51 | length 28.2
  Top Layer w0.099: IC11.51@26.308,50.48 26.406,50.578 26.406,54.009 cw(c27.308,54.009) 27.308,54.911 46.308,54.911 ccw(c46.308,55.508) 46.905,55.508 46.905,58.617 C101.1@46.782,58.739
PLL_RSTb: IC11.6 J4.D12 | length 63.9
  Slow_Ctrl w0.137: v3(19.667,47.28) ccw(c19.667,48.282) 20.668,48.282 20.668,51.379 cw(c22.374,51.379) 22.374,53.084 36.992,53.084 ccw(c36.992,53.392) 37.209,53.174 37.257,53.222 cw(c37.594,52.884) 37.594,53.361 37.676,53.361 cw(c37.676,53.001) 37.931,53.256 38.036,53.151 ccw(c38.197,53.312) 38.197,53.084 63.347,53.084 cw(c63.347,51.361) 65.07,51.361 65.07,41.858 ccw(c67.108,41.858) v3(67.108,39.82)
PLL_SMA_OUT_N: C104.2 J10.1 | length 5.9
  Top Layer w0.117: C104.2@47.332,59.289 J10.1@53.195,59.289
PLL_SMA_OUT_P: C101.2 J8.1 | length 5.9
  Top Layer w0.117: J8.1@40.92,59.289 C101.2@46.782,59.289
PSF_IN_C_N: C141.2 ICx1.4 | length 9.7
  Top Layer w0.099: v1(38.125,10.406) ICx1.4@38.125,10.757
  uStrip1 w0.094: v1(38.125,10.406) ccw(c38.125,10.34) 38.059,10.34 38.059,9.788 ccw(c39.279,9.788) 39.279,8.567 39.838,8.567 40.461,8.567 ccw(c40.461,8.741) 40.635,8.741 40.635,8.77 cw(c40.809,8.77) 40.983,8.77 40.983,8.741 ccw(c41.157,8.741) 41.157,8.567 41.552,8.567 45.481,8.567 ccw(c45.481,8.665) v1(45.579,8.665)
PSF_IN_C_P: C140.2 ICx1.2 | length 9.8
  Top Layer w0.099: v1(37.687,10.406) ICx1.2@37.687,10.757
  uStrip1 w0.094: v1(37.687,10.406) cw(c37.687,10.34) 37.754,10.34 37.754,9.788 ccw(c39.279,9.788) 39.279,8.263 45.481,8.263 cw(c45.481,8.165) v1(45.579,8.165)
PSF_IN_N: C141.1 U6.17 | length 0.8
  Top Layer w0.099: C141.1@46.129,8.592 46.802,8.592 ccw(c46.802,8.665) U6.17@46.875,8.665
PSF_IN_P: C140.1 U6.18 | length 0.8
  Top Layer w0.099: C140.1@46.129,8.238 46.802,8.238 cw(c46.802,8.165) U6.18@46.875,8.165
RXUSRCLK_N: C107.2 J4.G7 | length 56
  uStrip1 w0.094: v1(19.233,53.072) cw(c19.233,52.978) 19.328,52.978 19.328,52.044 ccw(c20.599,52.044) 20.599,50.774 25.701,50.774 ccw(c25.701,51.782) 26.71,51.782 26.71,53.766 cw(c27.565,53.766) 27.565,54.622 58.433,54.622 cw(c58.433,53.173) 59.881,53.173 59.881,47.645 ccw(c60.873,47.645) 60.873,46.653 62.815,46.653 cw(c62.815,46.17) v5(63.298,46.17)
  other v2: 63.298,46.17
RXUSRCLK_P: C105.2 J4.G6 | length 56
  uStrip1 w0.094: v1(19.727,53.075) ccw(c19.727,52.98) 19.633,52.98 19.633,52.044 ccw(c20.599,52.044) 20.599,51.078 21.689,51.078 21.924,51.078 ccw(c21.924,51.252) 22.098,51.252 22.098,51.281 cw(c22.272,51.281) 22.446,51.281 22.446,51.252 ccw(c22.62,51.252) 22.62,51.078 23.015,51.078 25.701,51.078 ccw(c25.701,51.782) 26.405,51.782 26.405,53.766 cw(c27.565,53.766) 27.565,54.926 58.433,54.926 cw(c58.433,53.173) 60.186,53.173 60.186,47.641 ccw(c60.873,47.641) 60.873,46.954 62.815,46.957 ccw(c62.815,47.44) v5(63.298,47.44)
  other v2: 63.298,47.44
SCL0: IC10.5 J2.5 RN3.6 | length 37.7
  Clocks w0.137: v3(27.376,15.522) 32.159,10.738 cw(c31.967,10.545) v3(32.239,10.545)
  Slow_Ctrl w0.117: v3(28.467,2.777) 28.997,2.874 ccw(c28.923,3.277) 29.305,3.129 v3@32.188,10.565
  uStrip2 w0.102: v3(23.471,32.115) 25.481,32.115 cw(c25.481,30.22) 27.376,30.22 v3(27.376,15.522)
  Bottom Layer w0.117: J2.5@22.171,32.115 v3(23.471,32.115) ; RN3.6@27.692,2.837 v3(28.467,2.777)
  Bottom Layer w0.152: RN3.6@27.618,2.849 RN3.6@27.692,2.837
SCL1: IC10.7 J3.5 RN3.8 | length 20.2
  Slow_Ctrl w0.137: v3(23.471,17.865) ccw(c24.899,17.865) 23.889,16.855 24.697,16.048 cw(c24.348,15.699) 24.841,15.699 24.841,12.559 ccw(c27.381,12.559) 25.585,10.763 26.928,9.42 cw(c25.132,7.624) 27.672,7.624 27.672,2.572 ccw(c28.467,2.572) v3(28.467,1.777)
  Bottom Layer w0.117: J3.5@22.171,17.865 v3(23.471,17.865) ; RN3.8@27.692,2.037 v3(28.467,1.777)
  Bottom Layer w0.152: RN3.8@27.618,2.049 RN3.8@27.692,2.037
SCL_1V: ICx1.14 R82.2 TP17.1 U9.3 | length 29.3
  Top Layer w0.102: v3@35.972,13.757 ccw(c37.169,13.757) 36.856,12.602 36.929,12.582 ccw(c36.969,12.729) 36.951,12.578 37.025,12.569 ccw(c37.169,13.757) ICx1.14@37.169,12.56
  Top Layer w0.117: TP17.1@30.16,16.125 33.637,16.125 cw(c33.637,13.791) v3(35.972,13.791) v3@35.972,13.757 ; U9.3@42.051,3.99 42.051,4.356 cw(c42.589,4.356) R82.2@42.209,4.736 v3(42.74,4.736)
  uStrip2 w0.102: v3(35.972,13.791) ccw(c35.675,13.791) 35.675,14.087 34.489,14.087 ccw(c34.489,13.209) 33.61,13.209 33.61,10.415 ccw(c36.15,10.415) 34.354,8.619 37.831,5.142 cw(c36.997,4.308) 38.176,4.308 ccw(c38.54,4.308) 38.54,3.944 41.948,3.944 ccw(c41.948,4.736) v3(42.74,4.736)
SCL_CDR_0: IC10.9 RN1.2 U1_l0.20 | length 59.1
  uStrip2 w0.102: v3(28.467,0.777) 28.83,0.777 ccw(c28.83,1.681) 29.734,1.681 29.734,22.531 cw(c30.689,22.531) 30.689,23.486 32.383,23.486 ccw(c32.374,26.054) 34.943,26.054 34.943,28.421 cw(c35.517,28.421) 35.517,28.995 ccw(c35.517,29.648) 36.17,29.648 36.17,30.351 ccw(c35.654,30.351) 35.654,30.867 35.479,30.867 cw(c35.479,31.393) 34.952,31.393 34.952,38.801 cw(c35.502,38.801) 35.502,39.351 ccw(c35.502,40.081) 35.953,39.508 ccw(c35.502,40.081) 36.232,40.081 36.232,41.316 cw(c37.047,41.316) 37.047,42.13 37.807,42.13 ccw(c37.807,44.67) 39.603,42.874 41.299,44.57 cw(c43.095,42.774) 43.095,45.314 v3(45.553,45.314)
  Bottom Layer w0.117: RN1.2@27.709,0.953 v3(28.467,0.777)
  Bottom Layer w0.127: RN1.2@27.622,0.977 RN1.2@27.709,0.953
SCL_CDR_1: IC10.11 RN1.4 U1_l1.20 | length 31
  Clocks w0.137: v3(28.467,-0.223) 28.274,-0.223 cw(c28.274,0.716) 27.335,0.716 27.335,4.795 cw(c28.221,4.795) 28.221,5.681 31.879,5.681 ccw(c31.879,6.882) 32.728,6.032 ; 32.729,6.033 35.062,8.366 ccw(c33.939,9.489) 35.527,9.489 cw(c37.518,9.489) 36.11,10.897 cw(c37.044,9.963) 37.044,11.283 ccw(c37.044,12.674) 38.027,11.691 42.335,15.998 cw(c43.219,15.114) 43.219,16.365 cw(c43.219,14.978) 44.199,15.959 v3(45.553,14.605)
  Bottom Layer w0.117: RN1.4@27.709,0.153 v3(28.467,-0.223)
  Bottom Layer w0.127: RN1.4@27.622,0.177 RN1.4@27.709,0.153
SCL_CDR_2: IC10.14 RN2.2 U1_l2.20 | length 48.7
  Clocks w0.127: v3(31.065,-0.223) 31.065,-0.749 cw(c30.602,-0.749) 30.602,-1.212 26.708,-1.212 cw(c26.708,-0.388) 25.884,-0.388 25.884,3.689 cw(c28.11,3.689) 26.536,5.264 27.253,5.981 cw(c28.32,4.914) 28.32,6.423 31.038,6.423 ccw(c31.038,7.495) 31.796,6.737 32.797,7.738 ccw(c31.035,9.5) 33.527,9.5 33.527,19.879 cw(c34.415,19.879) 34.415,20.766 44.63,20.766 ccw(c44.63,21.69) 45.554,21.69 v3@45.554,24.841
  Bottom Layer w0.117: v3(31.065,-0.223) 31.644,-0.197 RN2.2@31.73,-0.173
  other v3: 45.553,24.841
SCL_CDR_3: IC10.16 RN2.4 U1_l3.20 | length 44.4
  uStrip2 w0.102: v3(31.065,0.777) 30.724,1.118 cw(c31.759,2.153) 30.295,2.153 30.295,22.141 cw(c31.086,22.141) 31.086,22.932 32.597,22.932 ccw(c32.597,25.444) 34.373,23.668 cw(c34.444,23.595) 34.375,23.67 ccw(c32.545,25.713) 34.484,23.773 35.335,24.624 ccw(c34.336,25.622) 35.748,25.622 35.748,25.839 cw(c38.085,25.839) 35.863,26.562 cw(c38.015,25.839) 36.41,27.444 ccw(c35.017,28.837) 36.986,28.837 36.986,28.993 cw(c38.464,28.993) 37.04,29.388 37.121,29.614 cw(c37.5,29.478) 37.161,29.695 37.493,30.21 cw(c38.172,29.524) 38.172,30.489 38.509,30.489 ccw(c38.509,31.146) 38.973,30.682 42.625,34.334 cw(c44.421,32.538) 44.421,35.078 v3(45.553,35.078)
  Bottom Layer w0.117: v3(31.065,0.777) 31.644,0.651 RN2.4@31.73,0.627
SCL_PLL: IC10.18 R61.1 W5.2 | length 76.8
  Top Layer w0.117: v3(30.88,2.29) v3@30.979,2.191 ; IC10.18@31.978,1.777 31.324,1.869 31.162,2.005 cw(c31.265,2.127) 31.151,2.015 v3@30.979,2.191 ; v3@30.979,2.191 ccw(c30.895,2.109) 30.978,2.192 v3@30.979,2.191
  uStrip2 w0.102: W5.2@7.268,48.994 5.26,46.986 ccw(c7.056,45.19) 4.516,45.19 4.516,16.834 ccw(c7.056,16.834) 5.26,15.038 15.56,4.738 ccw(c17.356,6.534) 17.356,3.994 20.493,3.994 cw(c20.493,1.454) 22.289,3.25 26.827,-1.288 ccw(c28.623,0.508) 28.623,-2.032 31.976,-2.032 ccw(c31.976,-1.061) 32.947,-1.061 32.947,0.946 ccw(c31.603,0.946) 31.603,2.29 v3(30.88,2.29)
  Bottom Layer w0.117: v3(30.88,2.29) R61.1@31.428,2.29
SCL_PSC: J4.G22 U7.4 | length 29.4
  Top Layer w0.089: U7.4@52.789,5.157 v3(53.77,5.157)
  uStrip2 w0.094: 53.204,5.157 v3(53.77,5.157)
  uStrip2 w0.102: 53.204,5.157 cw(c53.204,5.601) 52.76,5.601 52.76,5.798 cw(c53.166,5.798) 52.879,6.085 58.248,11.454 ccw(c56.452,13.25) 58.992,13.25 58.992,24.58 cw(c61.532,24.58) 61.532,27.12 v3(63.298,27.12)
SCL_PSC_3V3: TP14.1 U6.23 U7.8 | length 10.6
  Top Layer w0.117: U6.23@49.492,7.548 49.492,5.157 v1(50.69,5.157) U7.8@51.389,5.157
  uStrip1 w0.102: v1(50.69,5.157) ccw(c50.69,6.61) 51.718,5.583 cw(c52.725,4.575) 52.725,6 53.463,6 cw(c53.463,3.46) 55.259,5.256 v1(56.186,4.329)
SCL_PSF: J4.G12 R84.2 U9.6 | length 56.9
  uStrip1 w0.102: v3(40.897,3.503) cw(c42.356,2.044) 42.356,4.107 42.539,4.107 ccw(c42.539,6.647) 44.335,4.851 46.49,7.006 cw(c47.461,6.035) 47.461,7.408 48.451,7.408 ccw(c48.451,9.948) 50.247,8.152 53.213,11.072 cw(c54.098,10.187) 53.227,11.086 cw(c54.098,10.187) 54.098,11.438 v3(55.172,11.438)
  Bottom Layer w0.117: v3(40.897,3.503) ccw(c42.169,3.503) 42.169,2.232 R84.2@43.153,2.232 ; v3(55.172,11.438) 55.748,12.014 ccw(c53.952,13.81) 56.492,13.81 56.492,40.101 cw(c56.985,40.101) 56.985,40.593 62.524,40.593 cw(c62.524,39.82) 62.536,40.593 63.025,40.586 cw(c63.021,40.301) 63.306,40.296 J4.G12@63.298,39.82
SDA0: IC10.4 J2.4 RN3.5 | length 36.3
  Top Layer w0.117: IC10.4@27.554,3.277 v3(28.923,3.277)
  Clocks w0.137: v3(26.683,15.537) 30.85,11.37 cw(c30.03,10.549) v3(31.19,10.549)
  Slow_Ctrl w0.137: v3(28.923,3.277) v3@31.148,10.562
  uStrip2 w0.102: v3(24.487,31.315) cw(c23.589,30.417) 24.859,30.417 24.859,21.012 ccw(c25.769,21.012) 25.769,20.102 cw(c25.769,19.188) 26.683,19.188 v3(26.683,15.537)
  Bottom Layer w0.117: J2.4@22.171,31.315 v3(24.487,31.315) ; RN3.5@27.704,3.273 v3(28.923,3.277)
  Bottom Layer w0.127: RN3.5@27.618,3.249 RN3.5@27.704,3.273
SDA1: IC10.6 J3.4 RN3.7 | length 22.7
  Top Layer w0.117: IC10.6@27.554,2.277 v3(28.923,2.277)
  uStrip2 w0.102: v3(24.487,17.065) ccw(c24.836,16.716) 24.343,16.716 24.343,8.348 ccw(c25.465,8.348) 24.671,7.554 cw(c23.831,6.715) 25.019,6.715 25.019,5.07 ccw(c27.559,5.07) 25.763,3.273 26.016,3.021 ccw(c27.812,4.817) 27.812,2.277 v3(28.923,2.277)
  Bottom Layer w0.117: J3.4@22.171,17.065 v3(24.487,17.065) ; RN3.7@27.704,2.425 v3(28.923,2.277)
  Bottom Layer w0.127: RN3.7@27.618,2.449 RN3.7@27.704,2.425
SDA_1V: ICx1.15 R74.2 R81.2 TP15.1 U9.4 U10.4 | length 28.9
  Top Layer w0.089: R74.2@40.552,4.535 40.567,4.535 cw(c41.051,4.05) 41.051,4.736 v3(41.166,4.736) R81.2@41.661,4.736 U9.4@41.661,3.76
  Top Layer w0.102: v3(35.47,13.425) ccw(c36.554,13.425) 36.554,12.341 ICx1.15@37.169,12.341
  Top Layer w0.117: TP15.1@30.322,14.477 34.418,14.477 cw(c34.418,13.425) v3(35.47,13.425)
  uStrip2 w0.102: v3(35.47,13.425) 34.706,13.425 ccw(c34.706,12.64) 33.921,12.64 33.921,10.663 ccw(c36.461,10.663) 34.665,8.867 38.152,5.381 cw(c37.363,4.592) 38.478,4.592 ccw(c38.78,4.592) 38.78,4.29 40.72,4.29 ccw(c40.72,4.736) v3(41.166,4.736)
  Bottom Layer w0.117: U10.4@34.498,10.214 34.498,11.291 cw(c35.023,11.291) 35.023,11.816 ccw(c35.023,12.264) 35.47,12.264 35.47,12.31 ; 35.47,12.311 v3(35.47,13.425)
SDA_CDR_0: IC10.8 RN1.1 U1_l0.21 | length 63.5
  Top Layer w0.117: IC10.8@27.554,1.277 v3(28.923,1.277)
  Top Layer w0.254: v3(46.053,44.884) U1_l0.21@46.053,45.859
  uStrip2 w0.102: v3(28.923,1.277) 29.231,1.585 ccw(c28.646,2.17) 29.473,2.17 29.473,6.489 ccw(c29.079,6.489) 29.079,6.884 28.221,6.884 cw(c28.221,7.432) 27.672,7.432 27.672,8.521 cw(c28.352,8.521) 28.352,9.201 28.9,9.201 ccw(c28.9,9.774) 29.473,9.774 29.473,22.685 cw(c30.639,22.685) 30.639,23.851 32.41,23.851 ccw(c32.41,26.079) 34.638,26.079 34.638,39.883 cw(c37.091,39.883) 37.091,42.336 37.807,42.336 ccw(c37.807,44.564) 39.383,42.989 41.378,44.984 cw(c43.174,43.188) 43.174,45.728 45.681,45.728 cw(c45.681,45.355) 46.053,45.355 v3(46.053,44.884)
  Bottom Layer w0.117: RN1.1@27.709,1.353 v3(28.923,1.277)
  Bottom Layer w0.127: RN1.1@27.622,1.377 RN1.1@27.709,1.353
SDA_CDR_1: IC10.10 RN1.3 U1_l1.21 | length 33.1
  Top Layer w0.117: IC10.10@27.554,0.277 v3(28.923,0.277)
  Top Layer w0.254: v3(46.053,14.175) U1_l1.21@46.053,15.15
  Clocks w0.137: v3(28.923,0.277) 28.304,0.277 cw(c28.304,0.869) 27.712,0.869 27.712,4.841 cw(c28.139,4.841) 28.139,5.268 31.917,5.268 ccw(c31.917,6.755) 32.968,5.703 36.055,8.79 ccw(c35.585,9.26) 36.249,9.26 cw(c36.69,9.26) 36.378,9.571 42.628,15.821 cw(c43.165,15.284) 43.165,16.043 cw(c43.165,15.119) 43.819,15.773 44.965,14.626 ; 44.966,14.625 cw(c44.867,14.53) 44.968,14.622 45.243,14.322 ccw(c45.553,14.605) 45.545,14.185 46.024,14.176 ccw(c46.053,15.714) v3(46.053,14.175)
  Bottom Layer w0.117: RN1.3@27.709,0.553 28.358,0.376 ccw(c28.467,0.777) 28.396,0.368 v3(28.923,0.277)
  Bottom Layer w0.127: RN1.3@27.622,0.577 RN1.3@27.709,0.553
SDA_CDR_2: IC10.13 RN2.1 U1_l2.21 | length 48.3
  Top Layer w0.117: v3(30.608,-0.723) IC10.13@31.978,-0.723
  Top Layer w0.254: v3(46.053,24.412) U1_l2.21@46.053,25.386
  Clocks w0.137: v3@30.608,-0.723 27.405,-0.723 cw(c27.405,-0.279) 26.961,-0.279 26.961,4.666 cw(c28.338,4.666) 28.338,6.042 31.246,6.042 ccw(c31.246,7.344) 32.166,6.423 ; 32.167,6.424 33.191,7.448 ccw(c31.395,9.244) 33.935,9.244 33.935,19.593 cw(c34.705,19.593) 34.705,20.363 44.854,20.363 ccw(c44.854,21.562) 46.053,21.562 v3(46.053,24.412)
  Bottom Layer w0.117: v3(30.608,-0.723) 31.644,-0.597 RN2.1@31.73,-0.573
SDA_CDR_3: IC10.15 RN2.3 U1_l3.21 | length 49.7
  Top Layer w0.117: v3(30.608,0.277) IC10.15@31.978,0.277
  Top Layer w0.254: v3(46.053,34.648) U1_l3.21@46.053,35.623
  uStrip2 w0.102: v3(30.608,0.277) cw(c32.074,1.743) 30.001,1.743 30.001,22.255 cw(c30.919,22.255) 30.919,23.173 32.545,23.173 ccw(c32.545,25.713) 34.341,23.917 35.191,24.767 ccw(c34.336,25.622) 35.545,25.622 35.545,25.839 cw(c38.085,25.839) 36.289,27.635 ccw(c35.618,28.365) 36.61,28.364 36.61,28.378 cw(c39.954,28.435) 36.868,29.726 cw(c38.968,28.848) 37.396,30.494 37.405,30.503 cw(c38.323,29.584) 38.323,30.882 ccw(c38.323,31.573) 38.811,31.085 43.058,35.331 cw(c43.846,34.543) 43.846,35.658 45.763,35.658 cw(c45.763,35.367) 46.053,35.367 v3(46.053,34.648)
  Bottom Layer w0.117: v3(30.608,0.277) 31.644,0.251 RN2.3@31.73,0.227
SDA_O: ICx1.16 R74.1 U10.1 | length 19.7
  Top Layer w0.102: v3(35.048,12.953) ccw(c35.878,12.953) 35.878,12.122 ICx1.16@37.169,12.122
  uStrip2 w0.102: v3(35.048,12.953) 34.767,12.953 ccw(c34.767,12.461) 34.275,12.461 34.275,10.488 ccw(c35.947,10.488) 34.763,9.308 34.766,9.305 v3(39.226,4.845)
  Bottom Layer w0.117: U10.1@34.977,9.427 34.977,9.392 34.969,9.392 34.969,8.954 cw(c34.751,8.954) 34.751,8.736 34.322,8.736 cw(c34.322,9.049) 34.009,9.049 34.009,12.499 cw(c34.462,12.499) 34.462,12.953 v3(35.048,12.953)